# Altium PCB AltiumSTM32_PCB.PcbDoc
Units mm, origin at the board's own origin, x right, y up, seen from the top; angles counter-clockwise.
Board outline 38.18 x 25.84 mm, 4 copper layers (L1 (Signal), l2 (Gnd), L3 (Gnd), L4 (Signal)), stack 1.57 mm thick; 35 components, 27 nets, 164 pads, 37 vias.
Unrouted connection lines stored in the file: 13.
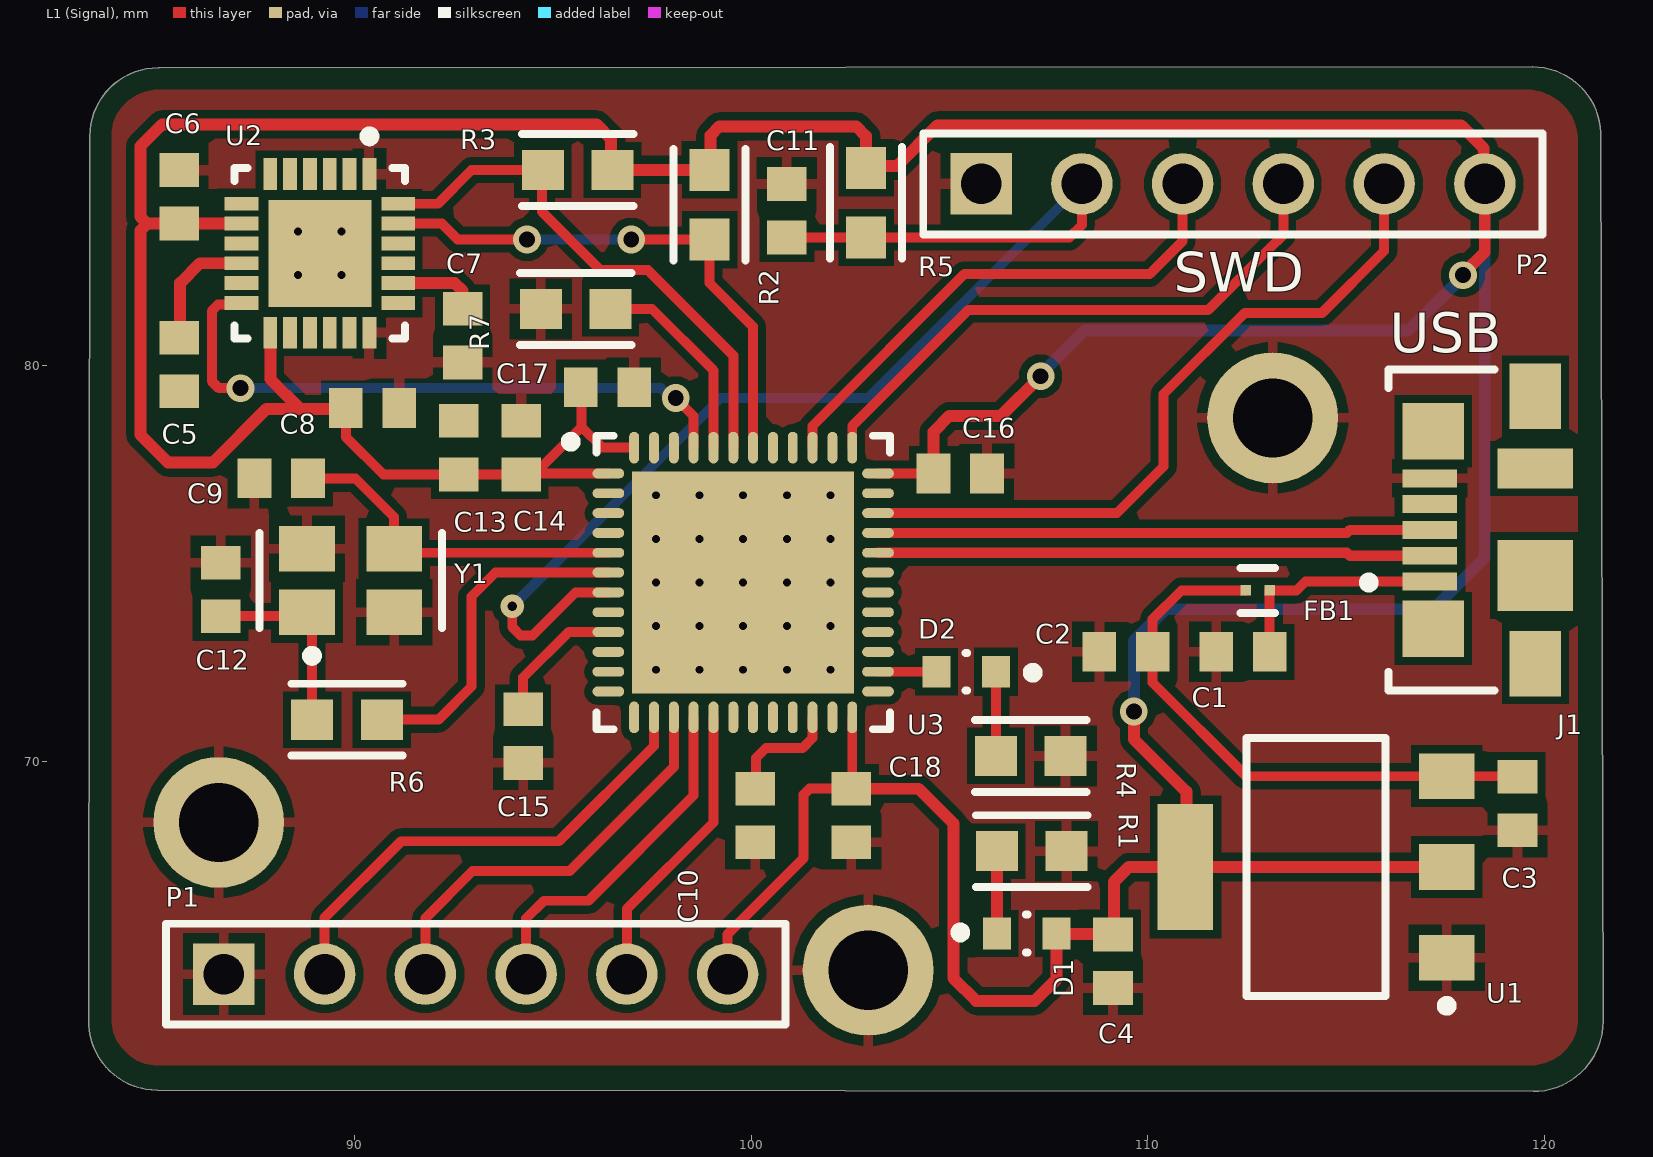
[diagram p0: L1 (Signal) view]
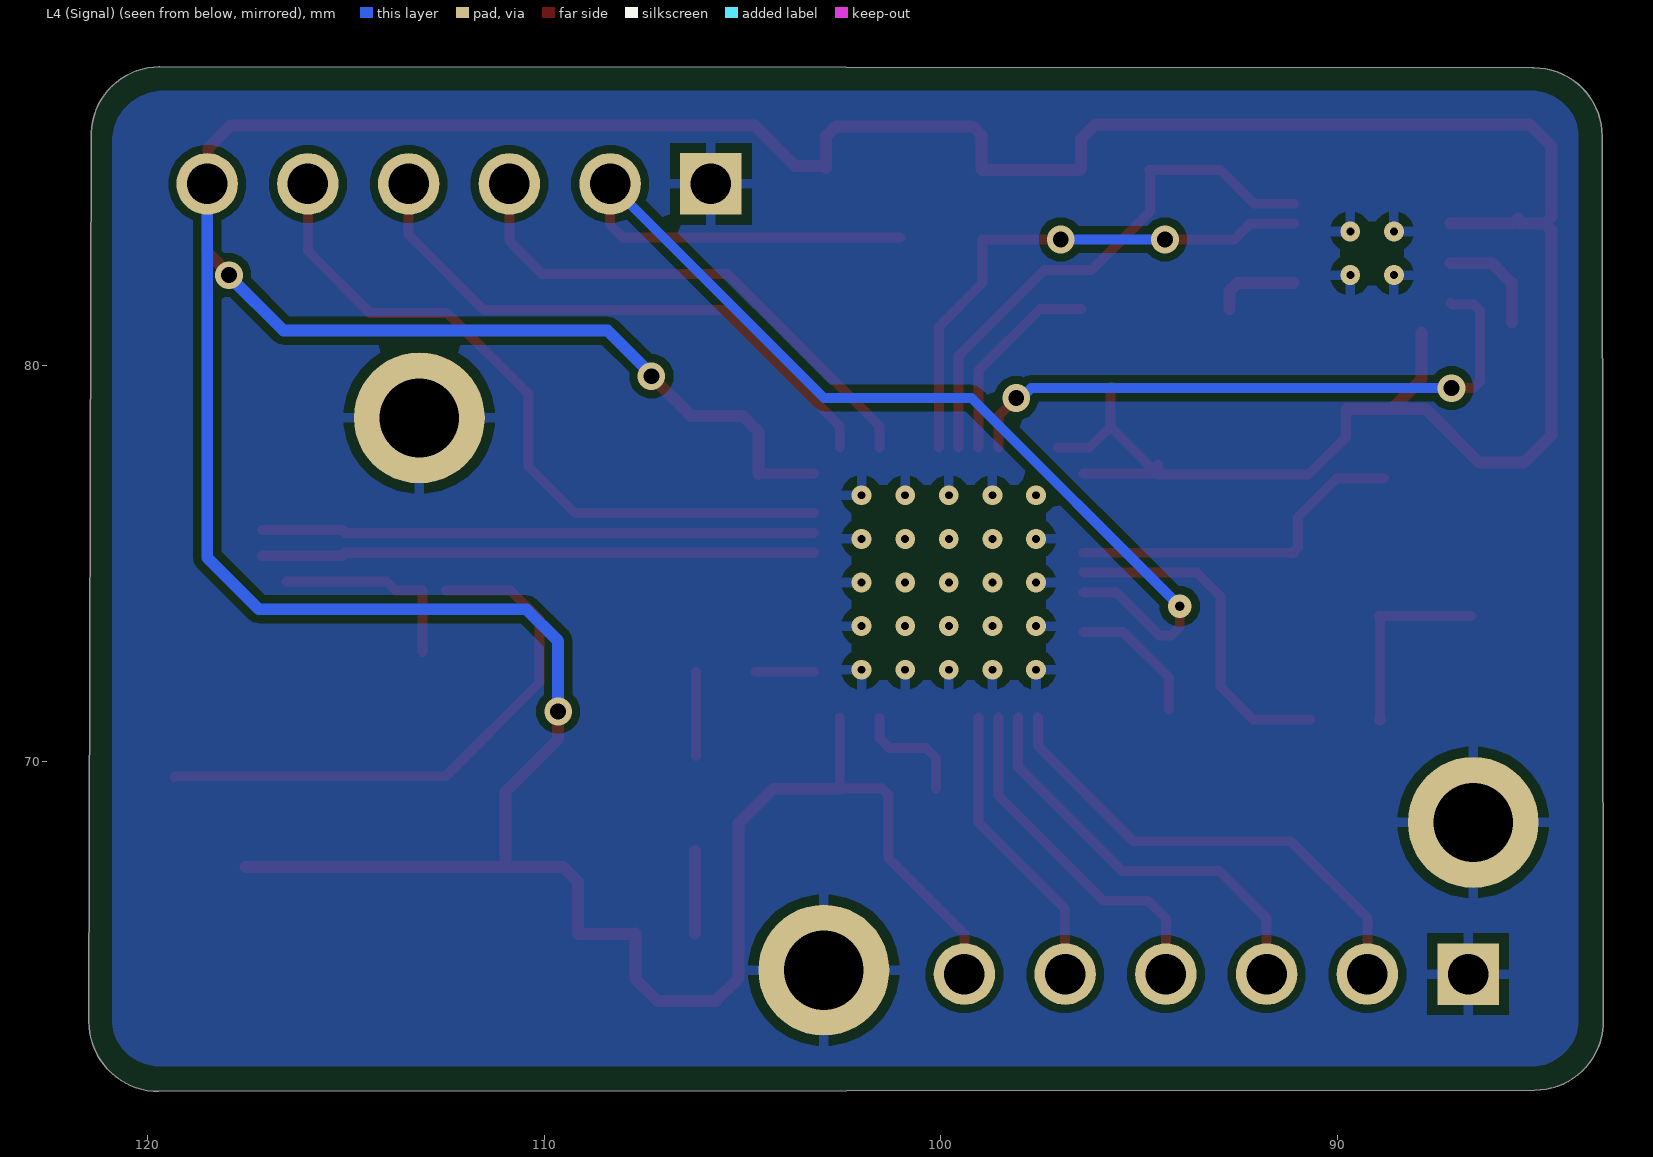
[diagram p1: L4 (Signal) view, seen from below]
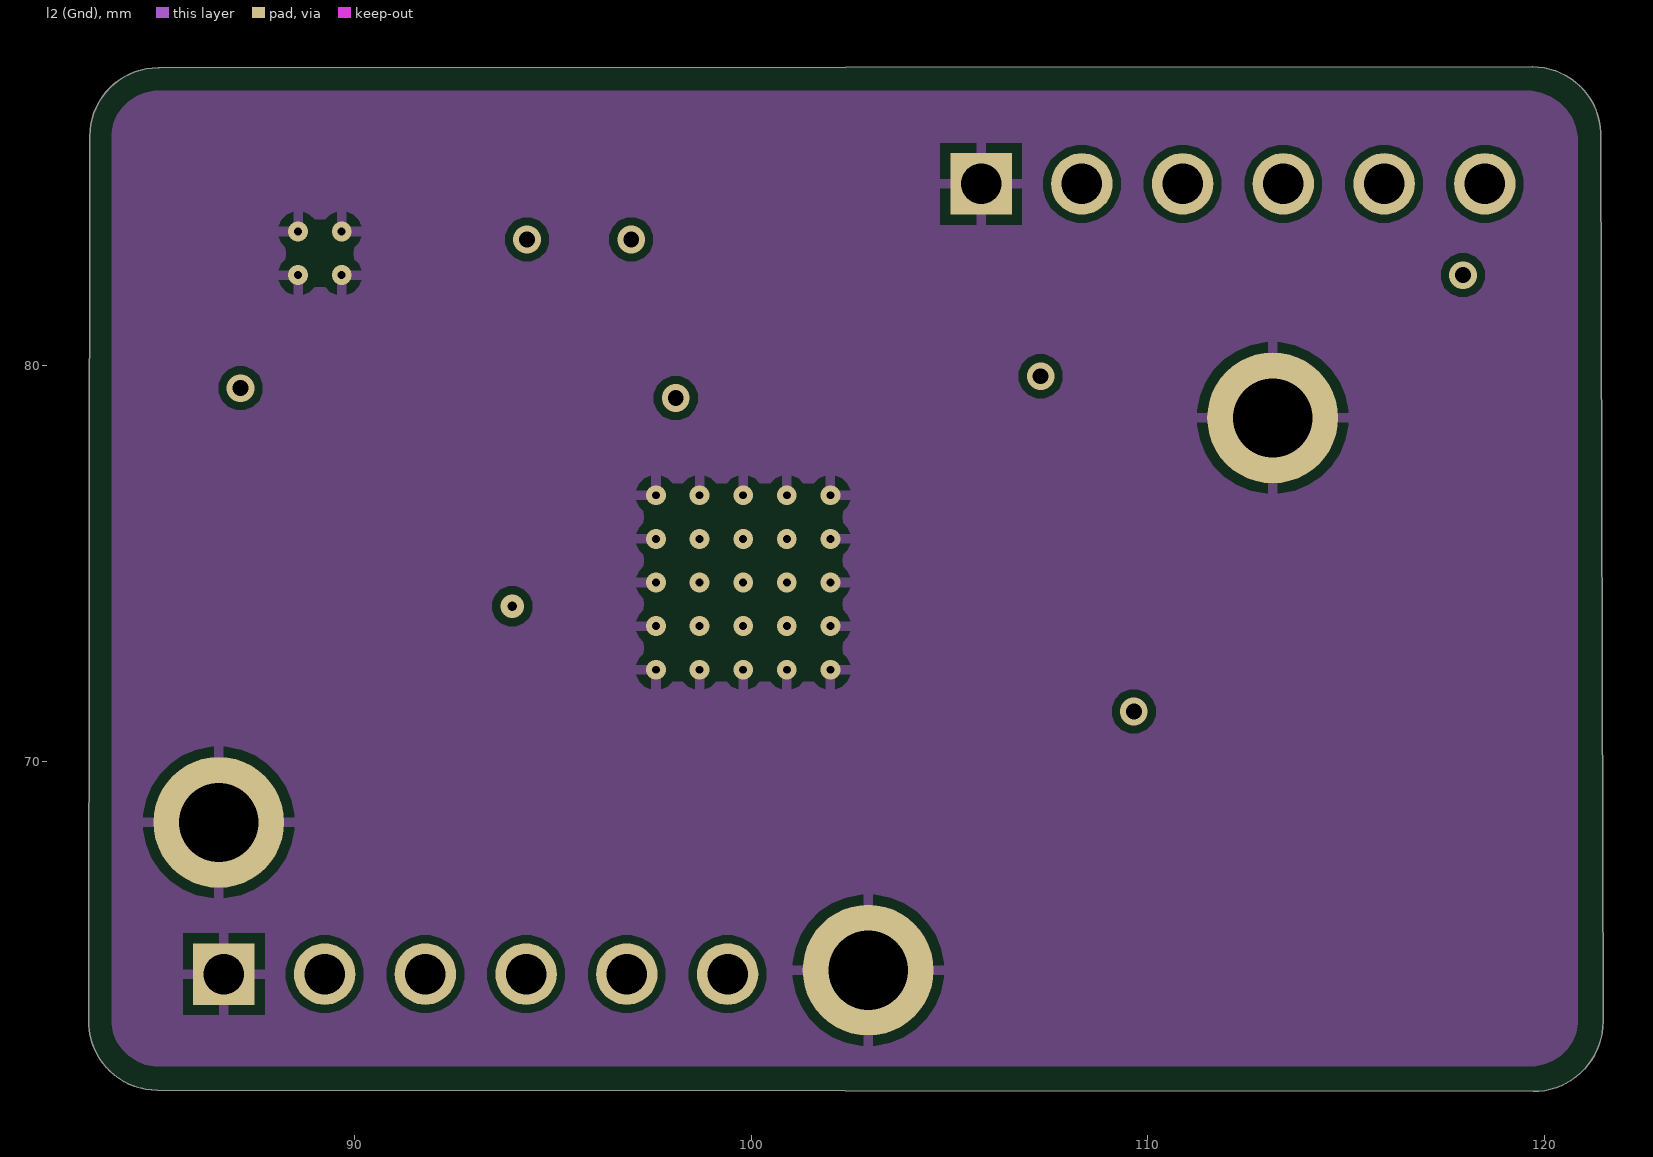
[diagram p2: l2 (Gnd)]
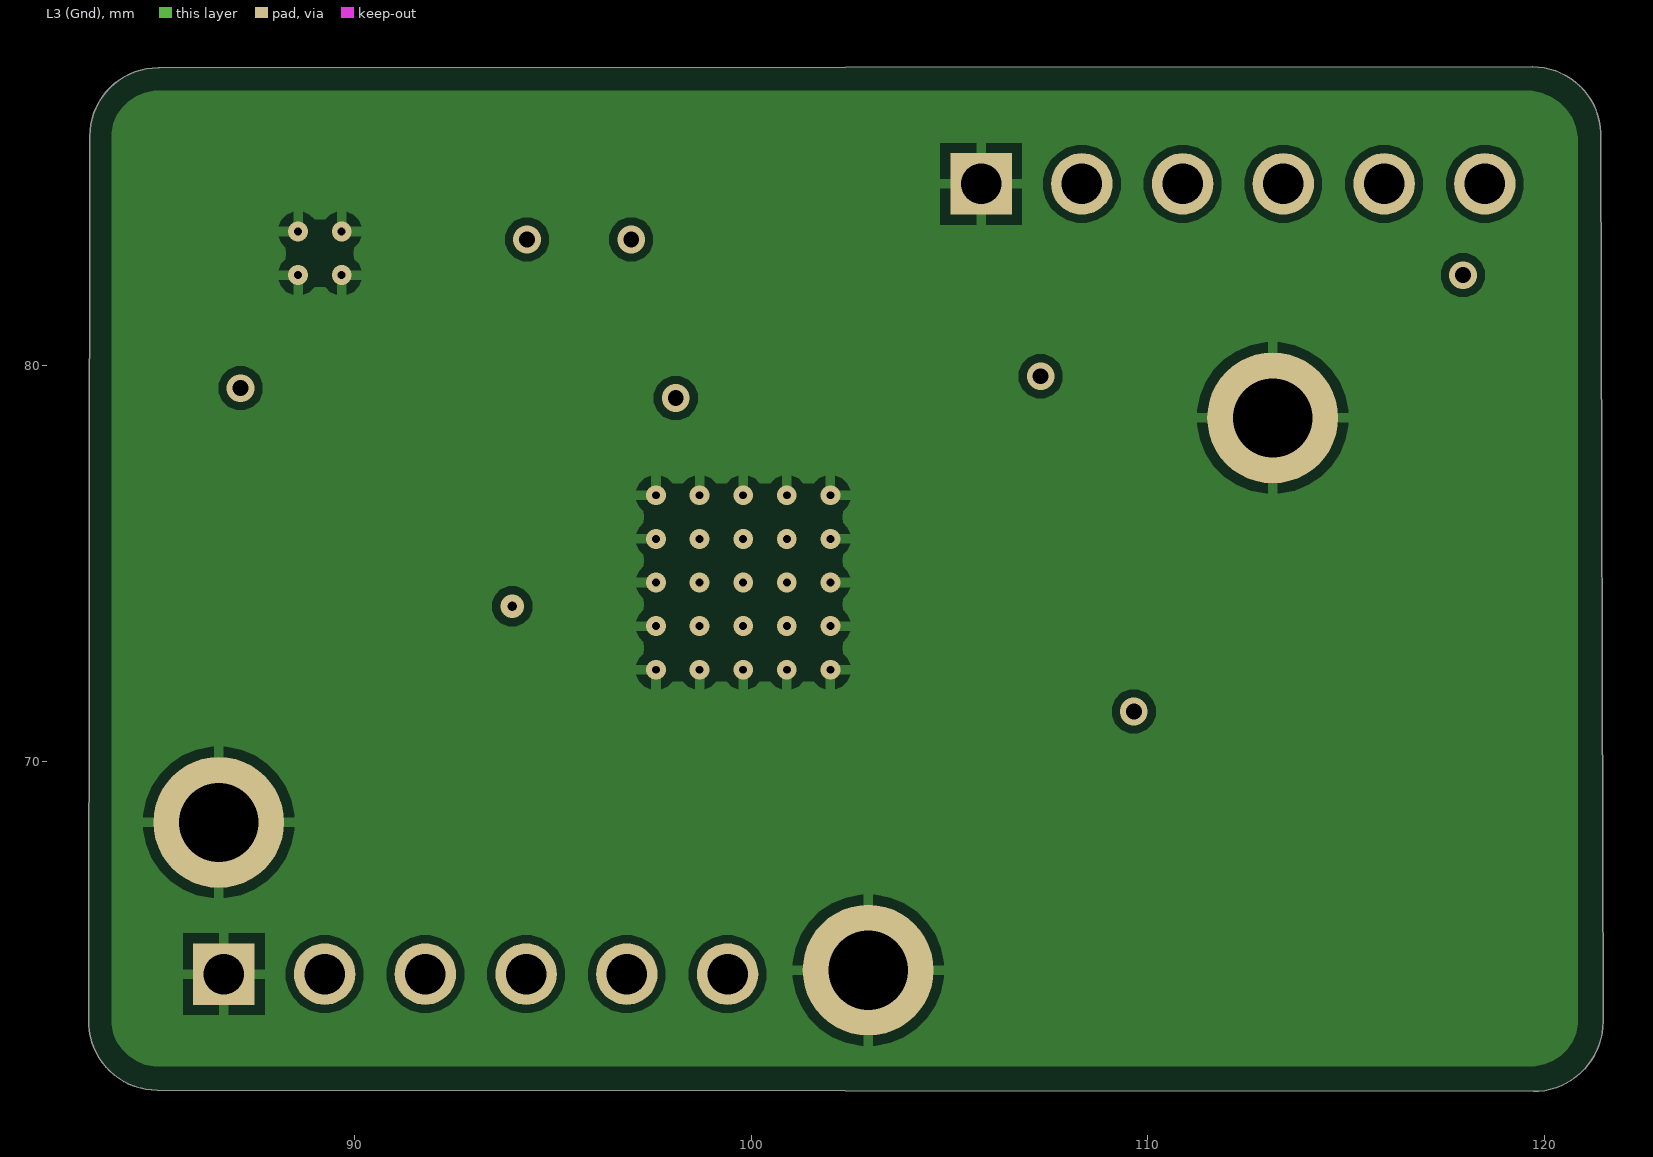
[diagram p3: L3 (Gnd)]

## Layer stack, top to bottom
Top Solder: solder mask 0.0254, SM-001, Dk 4
L1 (Signal): signal copper 0.035
Dielectric 1: prepreg 0.2, PP-017, Dk 4.6
l2 (Gnd): signal copper 0.0175
Dielectric 3: core 1.065, Core-039, Dk 4.8
L3 (Gnd): signal copper 0.0175
Dielectric 5: prepreg 0.2, PP-017, Dk 4.6
L4 (Signal): signal copper 0.035
Bottom Solder: solder mask 0.0254, SM-001, Dk 4

## Board outline
83.299,63.37 ccw(c85.025,63.45) 85.025,61.723 119.719,61.69 ccw(c119.719,63.456) 121.484,63.456 121.427,85.85 121.426,85.869 ccw(c119.7,85.8) 119.704,87.527 119.7,87.527 85.071,87.502 85.05,87.504 ccw(c85.05,85.776) 83.323,85.776 83.323,85.775

## Design rules (kind name [scope] priority, off if disabled: settings)
Clearance [All] p1: gap=0.2 ignorepadtopadclearanceinfootprint=FALSE
DiffPairsRouting [All] p1: maxlimit=0.254 minlimit=0.203 mostfreqgap=0.254 toplayer_maxgap=0.203 toplayer_prefgap=0.203 toplayer_minwidth=0.26 toplayer_maxwidth=0.26 toplayer_prefwidth=0.26 bottomlayer_maxgap=0.203 bottomlayer_prefgap=0.203 bottomlayer_minwidth=0.26 bottomlayer_maxwidth=0.26 bottomlayer_prefwidth=0.26 impedanceprofiledriven=TRUE impedanceprofileid={60D9353D-1B09-4BF2-BB60-DCA3EFFD3613} impedanceprofilevalue=90.000000 maxuncoupledlength=12.7
PolygonConnect [All] p1: connectstyle=Relief reliefconductorwidth=0.254 reliefentries=4 polygonreliefangle="90 Angle" airgapwidth=0.254
RoutingVias [All] p1: holewidth=0.3 width=0.7 viastyle="Through Hole" minholewidth=0.25 minwidth=0.55 maxholewidth=0.4 maxwidth=0.9
SolderMaskExpansion [All] p1: expansion=0 istentingtop=FALSE
SupplyNets "Schematic Supply Nets_3" [InNet('VBUS')] p1: voltage=0.000
SupplyNets "Schematic Supply Nets_2" [InNet('+5v')] p2: voltage=0.000
SupplyNets "Schematic Supply Nets_1" [InNet('+3.3v')] p3: voltage=0.000
SupplyNets "Schematic Supply Nets" [InNet('GND')] p4: voltage=0.000
Width [All] p1: maxlimit=1 minlimit=0.2 preferedwidth=0.3 midlayer1_minwidth=0.254 midlayer1_maxwidth=0.254 midlayer1_prefwidth=0.254 midlayer2_minwidth=0.254 midlayer2_maxwidth=0.254 midlayer2_prefwidth=0.254 minimp=50.000000 maximp=50.000000 favimp=50.000000
29 further rules are at their usual default settings.

## Classes and differential pairs
differential pair USB_D: +USB_D_P -USB_D_N

## Components (designator, comment, footprint, x,y, rotation, side; value= is the part's Value field where it differs from the comment)
C1 "2u2" CAPC1608X92X38NL15T08 112.4,72.775 r0 top
C2 "2u2" CAPC1608X92X38NL15T08 109.45,72.775 r0 top
C3 "22u" CAPC1608X92X38NL15T08 119.325,68.95 r90 top
C4 "22u" CAPC1608X92X38NL15T08 109.125,64.975 r90 top
C5 "100n" CAPC1608X92X38NL15T08 85.575,80.025 r90 top
C6 "10n" CAPC1608X92X38NL15T08 85.575,84.25 r270 top
C7 "2n2" CAPC1608X92X38NL15T08 92.725,80.75 r90 top
C8 "100n" CAPC1608X92X38NL15T08 90.45,78.925 r180 top
C9 "10p" CAPC1608X92X38NL15T08 88.15,77.15 r0 top
C10 "2u2" CAPC1608X92X38NL15T08 100.1,68.65 r90 top
C11 "100n" CAPC1608X92X38NL15T08 100.9,83.9 r270 top
C12 "10p" CAPC1608X92X38NL15T08 86.625,74.35 r270 top
C13 "22u" CAPC1608X92X38NL15T08 92.625,77.925 r270 top
C14 "100n" CAPC1608X92X38NL15T08 94.2,77.925 r270 top
C15 "100n" CAPC1608X92X38NL15T08 94.25,70.65 r90 top
C16 "100n" CAPC1608X92X38NL15T08 105.275,77.275 r180 top
C17 "100n" CAPC1608X92X38NL15T08 96.375,79.45 r180 top
C18 "100n" CAPC1608X92X38NL15T08 102.525,68.65 r90 top
D1 "APHD1608LZGCK" FP-APHD1608LZGCK-MFG 106.95,65.675 r0 top
D2 "APHD1608LZGCK" FP-APHD1608LZGCK-MFG 105.425,72.275 r180 top
FB1 "120R" FP-MMZ0603-IPC_C 112.775,74.325 r180 top (schematic designator FB?)
J1 "473460001" FP-473460001-MFG 119.425,75.85 r90 top
P1 "TSW-106-23-G-S" SMTC-TSW-106-23-X-S 86.705,64.65 r0 top
P2 "TSW-106-23-G-S" SMTC-TSW-106-23-X-S 105.8,84.575 r0 top
R1 "1k" FP-AC0603-IPC_A 107.075,67.75 r180 top
R2 "2K2" FP-AC0603-IPC_A 98.95,84.048 r90 top
R3 "2K2" FP-AC0603-IPC_A 95.625,84.925 r0 top
R4 "1k" FP-AC0603-IPC_A 107.05,70.15 r180 top
R5 "10k" FP-AC0603-IPC_A 102.9,84.1 r90 top
R6 "0R" FP-AC0603-IPC_A 89.809,71.065 r180 top
R7 "10k" FP-AC0603-IPC_A 95.575,81.425 r0 top
U1 "AMS1117-3.3" FP-AMS1117-IPC_C 114.245,67.35 r180 top
U2 "MPU-6050" IS-QFN-24_V 89.125,82.825 r270 top
U3 "STM32F411CEU6" STM-UFQFPN48_L 99.8,74.525 r0 top
Y1 "24MHZ" FP-TSX-3225-MFG 89.9,74.575 r0 top

## Footprints (in the part's own frame and the unit in brackets; to place one, negate y for a bottom-side part, rotate by r counter-clockwise, add the part's x,y. Pads: shape width x height; smd on the part's side, far side on the other; paste and mask are expansions set on the pad)
CAPC1608X92X38NL15T08 [mm] "Chip Capacitor, 2-Leads, Body 1.60x0.80mm, IPC Medium Density"
  rect 0.85x1 smd: 1(-0.675,0) 2(0.675,0)
  body extent -0.87,-0.48 0.87,0.47, height 0.92
FP-473460001-MFG [mm]
  rect 0.45x1.38 smd paste+0 mask+0: 1(-1.3,2.31) 2(-0.65,2.31) 3(0,2.31) 4(0.65,2.31) 5(1.3,2.31)
  rect 1.425x1.55 smd paste+0 mask+0: 6(-2.488,2.225) 7(2.488,2.225)
  rect 1.65x1.3 smd paste+0 mask+0: 8(-3.375,-0.35) 11(3.375,-0.35)
  rect 1.8x1.9 smd paste+0 mask+0: 9(-1.15,-0.35)
  rect 1x1.9 smd paste+0 mask+0: 10(1.55,-0.35)
  silkscreen extent -4.05,0.67 4.05,3.97, body extent -4.3,-2.48 4.3,3.45, height 0.25
FP-AC0603-IPC_A [mm]
  rect 1.059x1.012 smd paste+0 mask+0: 1(-0.877,0) 2(0.877,0)
  silkscreen extent -1.41,-0.91 1.41,0.91, body extent -1.91,-1.01 1.91,1.01, height 0.25
FP-AMS1117-IPC_C [mm]
  rect 1.4x1.15 smd paste+0 mask+0: 1(-3.295,2.29) 2(-3.295,0) 3(-3.295,-2.29)
  rect 1.404x3.182 smd paste+0 mask+0: 4(3.295,0)
  silkscreen extent -3.42,-3.25 1.75,3.62, body extent -3.9,-3.35 3.9,3.35, height 0.25
FP-APHD1608LZGCK-MFG [mm]
  rect 0.7x0.8 smd paste+0 mask+0: 1(-0.75,0) 2(0.75,0)
  silkscreen extent -1.8,-0.48 0.03,0.48, body extent -1.2,-0.58 1.2,0.58, height 0.25
FP-MMZ0603-IPC_C [mm]
  rect 0.263x0.263 smd paste+0 mask+0: 1(-0.3,0) 2(0.3,0)
  silkscreen extent -0.43,-0.57 0.43,0.57, body extent -0.53,-0.27 0.53,0.27, height 0.25
FP-TSX-3225-MFG [mm]
  rect 1.4x1.15 smd paste+0 mask+0: 1(-1.1,-0.8) 2(1.1,-0.8) 3(1.1,0.8) 4(-1.1,0.8)
  silkscreen extent -2.3,-2.02 2.3,1.2, body extent -1.9,-1.48 1.9,1.48, height 0.25
IS-QFN-24_V [mm] "QFN, 24-Leads, Body 4x4mm, Pitch 0.5mm, Thermal Pad 2.7x2.6mm"
  rect 0.8x0.35 smd: 1(-2,1.25) 2(-2,0.75) 3(-2,0.25) 4(-2,-0.25) 5(-2,-0.75) 6(-2,-1.25) 13(2,-1.25) 14(2,-0.75) 15(2,-0.25) 16(2,0.25) 17(2,0.75) 18(2,1.25)
  rect 0.35x0.85 smd mask+0.102: 7(-1.25,-1.975) 8(-0.75,-1.975) 9(-0.25,-1.975) 10(0.25,-1.975) 11(0.75,-1.975) 12(1.25,-1.975) 19(1.25,1.975) 20(0.75,1.975) 21(0.25,1.975) 22(-0.25,1.975) 23(-0.75,1.975) 24(-1.25,1.975)
  rect 2.7x2.6 smd: 25(0,0)
  silkscreen extent -3.07,-2.15 2.15,2.15, body extent -2,-2 2,2, height 0.95
SMTC-TSW-106-23-X-S [mm] ".025 SQ Post Terminal Strip Assembly, 1x6 Pins, Vertical, 2.54mm Pitch, Male"
  rect 1.55x1.55 hole 1.02: 1(0,0)
  round 1.55 hole 1.02: 2(2.54,0) 3(5.08,0) 4(7.62,0) 5(10.16,0) 6(12.7,0)
  silkscreen extent -1.46,-1.27 14.16,1.27, body extent -1.27,-1.27 13.97,1.27, height 8.38
STM-UFQFPN48_L [mm] "QFN, 48-Leads, Body 7.1x7.1mm, Pitch 0.5mm, Thermal Pad 5.6x5.6mm, IPC High Density"
  oval 0.8x0.25 smd: 1(-3.4,2.75) 2(-3.4,2.25) 3(-3.4,1.75) 4(-3.4,1.25) 5(-3.4,0.75) 6(-3.4,0.25) 7(-3.4,-0.25) 8(-3.4,-0.75) 9(-3.4,-1.25) 10(-3.4,-1.75) 11(-3.4,-2.25) 12(-3.4,-2.75) 25(3.4,-2.75) 26(3.4,-2.25) 27(3.4,-1.75) 28(3.4,-1.25) 29(3.4,-0.75) 30(3.4,-0.25) 31(3.4,0.25) 32(3.4,0.75) 33(3.4,1.25) 34(3.4,1.75) 35(3.4,2.25) 36(3.4,2.75)
  oval 0.25x0.8 smd: 13(-2.75,-3.4) 14(-2.25,-3.4) 15(-1.75,-3.4) 16(-1.25,-3.4) 17(-0.75,-3.4) 18(-0.25,-3.4) 19(0.25,-3.4) 20(0.75,-3.4) 21(1.25,-3.4) 22(1.75,-3.4) 23(2.25,-3.4) 24(2.75,-3.4) 37(2.75,3.4) 38(2.25,3.4) 39(1.75,3.4) 40(1.25,3.4) 41(0.75,3.4) 42(0.25,3.4) 43(-0.25,3.4) 44(-0.75,3.4) 45(-1.25,3.4) 46(-1.75,3.4) 47(-2.25,3.4) 48(-2.75,3.4)
  rect 5.6x5.6 smd: 49(0,0)
  silkscreen extent -4.47,-3.7 3.7,3.7, body extent -3.55,-3.55 3.55,3.55, height 0.6

## Part data
C1 C2 C3 C4 C5 C6 C7 C8 C9 C10 C11 C12 C13 C14 C15 C16 C17 C18: library part CMP-2006-01455-1, Manufacturer=Vitramon, Part Number=VJ0603A150JXAAT
D1 D2: library part CMP-44529-000045-1, "LED GREEN CLEAR 1608 SMD", Case Code (Imperial)=0603, Case Code (Metric)=1608, Color=Green, Forward Voltage=2.65V, Lens Color=Colorless, Test Current=2mA, Case/Package=0603, Dominant Wavelength=525nm, Height=0.75mm, Length=1.6mm, Lens Size=0.7mm, Lens Style=Round, Lens Transparency=Clear, Luminous Intensity=180mcd, Mount="Surface Mount", Packaging="Tape and Reel", Viewing Angle=100°, Width=0.8mm
FB1: library part CMP-06046-002357-1, "Chip Ferrite Bead, 1206, 1000Ω @ 100MHz, 0.075Ω, 25%, 2A", Case Code (Imperial)=1206, Case Code (Metric)=3216, DC Resistance (DCR)=75mR, Max Current Rating=2A, Max Operating Temperature=125°C, Min Operating Temperature=-55°C, Case/Package=1206, Mount="Surface Mount", Number of Lines=1, Packaging="Tape and Reel", RoHS Compliant=Yes
J1: library part CMP-2000-05246-2, "CONN RCPT USB2.0 MICRO B SMD R/A", Current Rating=1.8A, Manufacturer=Molex, Package=0, Temperature="-30°C to +85°C", Temperature Range High=+85°C, Temperature Range Low=-30°C, Voltage Rating=30V, Automotive=No, Category=Conn, ComponentLink2Description=Datasheet, ComponentLink2URL=https://www.molex.com/webdocs/datasheets/pdf/en-us/0473460001_IO_CONNECTORS.pdf, Conn Orientation="Right Angle", Contact Material=Gold,Nickel, Device Class L1=Connectors, Device Class L2="USB Connectors", Device Class L3=unset, Digikey Description="CONN RCPT USB2.0 MICRO B SMD R/A", Footprint Url=https://www.molex.com/pdm_docs/sd/473460001_sd.pdf, Height=2.945mm, Is Female=yes, Lead Free=Yes, Manufacturer Part Number=473460001, Number Of Contacts=5, Octopart=https://octopart.com/47346-0001-molex-7164928, Pitch=0.65mm, RoHS=TRUE, Shielding=true, Usb Standard="USB 2.0"
P1 P2: library part CMP-1024-00396-1, "0.025\" SQ Post Header, Through-hole, Vertical, -55 to 125 degC, 2.54 mm Pitch, 6-Pin, Male, RoHS", Manufacturer=Samtec, Temperature Range="-55 to 125 degC", ComponentLink1Description="Manufacturer URL", ComponentLink1URL=http://www.samtec.com, ComponentLink2Description=Datasheet, ComponentLink2URL=http://www.samtec.com/documents/webfiles/pdf/TSW_TH.PDF, ComponentLink3Description="Package Specification", ComponentLink3URL=http://www.samtec.com/documents/webfiles/cpdf/TSW-XXX-XX-XXX-X-XX-XXX-MKT.pdf, DatasheetVersion=F-214, Mounting Technology=Through-hole, Orientation=Vertical, PackageDescription=".025[0.64] SQ. Post Terminal Strip Assembly", PackageReference=TSW-106-23-X-S, PackageVersion="DM, 8/1988", PartNumber=TSW-106-23-G-S, Pitch="2.54 mm", RoHS=True
R1 R2 R3 R4 R5 R6 R7: library part CMP-03412-029901-2, "RES 8.66Ω 1.00% 0.1W 0603", RoHS Compliant=Yes
U1: library part CMP-209535-000001-1, "LDO Voltage Regulators 1A, 3.3V", Dropout Voltage=1.1V, Manufacturer="Advanced Monolithic Systems", Max Junction Temp=+125°C, Max Power Dissipation=1.2W, Max Supply Voltage=15V, Nominal Supply Current=5mA, Output Current=1A, Output Voltage=3.3V, Package=AMS1117, Temperature="-40°C to +125°C", Temperature Range Low=-40°C, Automotive=No, Category=IC, ComponentLink2Description=Datasheet, ComponentLink2URL=http://www.advanced-monolithic.com/pdf/ds1117.pdf, Device Class L1="Integrated Circuits (ICs)", Device Class L2="Power Management ICs", Device Class L3="Voltage Regulators - Linear", Height=1.8mm, Ipc Land Pattern Name=SOT229P700X180-4, Lead Free=Yes, Manufacturer Part Number=AMS1117-3.3, Number Of Outputs=1, Octopart=https://octopart.com/ams1117-3.3-advanced+monolithic+systems-25899300, Output Type=Fixed, RoHS=TRUE, Standoff Height=0.64mm, Temperature Range High=+125°C
U2: library part CMP-1753-00002-2, "3-Axis Gyroscope, Accelerometer and a Digital Motion Processor(TM) (DMP), 2.375 to 3.46 V, -40 to 85 degC, 24-Pin QFN, RoHS, Tape and Reel", Manufacturer=InvenSense, Standard Package=5,000, Category=Sensors,Transducers, Datasheet URL=http://datasheet.octopart.com/MPU-6050-InvenSense-datasheet-14421344.pdf, Datasheet Version="Rev. 3.3, 05/2012", Dynamic Catalog=MPU-6000™Series, Family=Multifunction, Featured Product=MPU-60506-Axis,IntegratedI²CSolution, Manufacturer URL=http://www.invensense.com/, Online Catalog=MPU-6000™Series, Other Names="1428-1007-2 / MPU6050", Output Type=Digital, Sensor Type=MotionTracking, Unit PriceUSD=Digital
U3: library part CMP-0243-00165-1, "ARM Cortex-M4 32-bit MCU+FPU, 512 KB Flash, 128 KB RAM, 36 I/Os, 48-Pin UFQFPN, -40 to 85 degC, Tray", I/Os (High Current)=36, Operating Frequency(F) (Processor speed) (MHz)=100, Package Description=UFQFPN48, Package Reference="48-Pin Ultra Thin Fine Pitch Quad Flat No-Lead, 7 x 7 x 0.6 mm Body, 0.5 mm Pitch, Exposed Pad", Supply Voltage(Vcc) min (V)=1.7, ComponentLink1Description="Manufacturer URL", ComponentLink1URL=http://www.st.com/, ComponentLink2Description=Datasheet, ComponentLink2URL=http://www.st.com/st-web-ui/static/active/en/resource/technical/document/datasheet/DM00115249.pdf, Core="ARM Cortex-M4", DatasheetVersion="Rev. 6", FLASH Size (Prog) (kB)=512, Internal RAM Size (kB)=128, Mounting Technology="Surface Mount", Packing=Tray
Y1: library part CMP-36405-000018-1, "CRYSTAL 24.0000MHZ 9PF SMD", Case/Package=SMD/SMT, ESR (Equivalent Series Resistance)=40R, Frequency=24MHz, Frequency Stability=20ppm, Frequency Tolerance=10ppm, Load Capacitance=9pF, Max Operating Temperature=105°C, Min Operating Temperature=-40°C, Package Quantity=250, Depth=2.5mm, Drive Level=200uW, Height=0.024inch, Lead Free="Lead Free", Length=3.2mm, Mount="Surface Mount", Number of Pins=4, Packaging="Tape and Reel", RoHS Compliant=Yes, Series=TSX-3225, Termination=SMD/SMT, Tolerance=10ppm, Weight=0.000564oz, Width=2.5mm

## Free pads (board coordinates)
  round 3.3 hole 2: 1(86.575,68.475) 7(113.15,78.675) 8(102.95,64.75)

## Via types
v1: diameter 0.5, hole 0.2, L1 (Signal) to L4 (Signal), 29 vias
v2: diameter 0.7, hole 0.4, L1 (Signal) to L4 (Signal), 7 vias
v3: diameter 0.6, hole 0.25, L1 (Signal) to L4 (Signal), 1 vias

## Nets (pads, with @x,y where several pads share a name; then routed paths per layer and width w, separated by ;. In a path a pad name is that pad's centre, name@x,y a point inside that pad or via, vN(x,y) a via of type N, cw(c..) or ccw(c..) an arc to the next point about the centre after c; other vN are vias at no path point)
+3.3v: C4.2 C6.2 C8.2 C13.2 C14.2 C15.2 C16.2 C17.2 C18.2 D1.2 P1.6 P2.6 R2.2 R3.2 R5.2 U1.2 U1.4 U2.8 U2.13 U3.1 U3.9 U3.24 U3.36 U3.48 | length 148.5
  L1 (Signal) w0.25: C8.2@89.775,78.85 89.775,78.9 C8.2 89.779,78.921 89.779,78.196 90.725,77.25 C13.2 ; C13.2@92.725,77.25 C14.2 C14.2@94.525,77.25 ; C15.2 94.25,72.125 95.4,73.275 U3.9 ; C14.2@94.375,77.275 C14.2@94.525,77.275 ; C14.2@94.525,77.5 C14.2@94.525,77.275 ; C17.2 95.725,79.425 95.725,78.45 ; U3.1 C14.2@94.55,77.275 ; U3.48 96.25,77.925 95.725,78.45 ; P1.6 99.405,65.655 101.325,67.575 101.325,69.179 101.471,69.325 C18.2 102.55,69.35 U3.24 ; U3.36 C16.2 ; C14.2@94.525,77.25 C14.2@94.525,77.275 ; C14.2@94.525,77.25 C14.2@94.55,77.275 ; C14.2@94.525,77.275 C14.2@94.55,77.275 ; C14.2@94.55,77.275 95.725,78.45
  L1 (Signal) w0.3: C6.2@85.45,83.575 84.776,83.575 ; C6.2@85.45,83.7 C6.2 ; C6.2@85.6,83.575 U2.8 ; U2.13 87.875,79.65 88.625,78.9 ; C8.2@89.775,78.9 88.625,78.9 ; C18.2 104.225,69.325 105.1,68.45 105.1,64.55 105.675,63.975 107.15,63.975 107.7,64.525 D1.2 107.712,65.663 109.112,65.663 C4.2 109.15,65.675 109.15,66.975 109.525,67.35 U1.4 ; C16.2 104.6,78.325 105,78.725 106.3,78.725 v2(107.3,79.725) ; v2(109.65,71.275) 109.65,70.575 110.975,69.25 110.975,67.375 U1.4 ; U1.2 U1.4 ; v2(117.95,82.275) 117.95,82.306 118.5,82.856 P2.6 118.475,84.6 118.475,85.475 117.9,86.05 104.7,86.05 103.675,85.025 102.948,85.025 R5.2 102.895,84.982 102.895,85.78 102.65,86.025 99.2,86.025 98.979,85.804 98.979,84.954 R2.2 R3.2 96.47,84.957 96.47,85.705 96.1,86.075 85.15,86.075 84.6,85.525 84.6,83.751 84.776,83.575 ; 84.776,83.575 84.6,83.399 84.6,78.25 85.3,77.55 86.425,77.55 87.775,78.9 88.625,78.9
  L4 (Signal) w0.3: v2(107.3,79.725) 107.3,79.775 108.4,80.875 116.574,80.875 117.95,82.251 v2(117.95,82.275) ; v2(109.65,71.275) 109.65,73.05 110.45,73.85 117.2,73.85 118.5,75.15 P2.6
+5v: C2.2 C3.2 FB1.2 U1.3 | length 14.4
  L1 (Signal) w0.25: FB1.2 110.85,74.325 110.125,73.6 110.125,72 112.485,69.64 U1.3 119.31,69.64 C3.2
GND: C1.1 C2.1 C3.1 C4.1 C5.1 C6.1 C7.1 C8.1 C9.1 C10.1 C11.1 C12.1 C13.1 C14.1 C15.1 C16.1 C17.1 C18.1 J1.5 P1.1 P2.1 pad.1 pad.7 pad.8 R1.1 R4.1 R7.1 U1.1 U2.1 U2.9 U2.11 U2.18 U2.25 U3.8 U3.23 U3.35 U3.47 U3.49 Y1.2 Y1.4
  other v1: 97.6,72.325 98.7,72.325 99.8,72.325 100.9,72.325 102,72.325 97.6,73.425 98.7,73.425 99.8,73.425 100.9,73.425 102,73.425 97.6,74.525 98.7,74.525 99.8,74.525 100.9,74.525 102,74.525 97.6,75.625 98.7,75.625 99.8,75.625 100.9,75.625 102,75.625 97.6,76.725 98.7,76.725 99.8,76.725 100.9,76.725 102,76.725 88.575,82.275 89.675,82.275 88.575,83.375 89.675,83.375
IMU_CPOUT: C7.2 U2.20 | length 2.2
  L1 (Signal) w0.3: U2.20 92.525,82.075 92.725,81.875 C7.2
IMU_INT: U2.12 U3.45 | length 15.9
  L1 (Signal) w0.25: v2(87.125,79.425) 86.575,79.425 86.4,79.6 86.4,81.375 86.56,81.535 87.11,81.535 U2.12 ; v2(98.1,79.175) 98.55,78.725 U3.45
  L4 (Signal) w0.25: v2(87.125,79.425) 97.728,79.425 97.978,79.175 v2(98.1,79.175)
IMU_REGOUT: C5.2 U2.10 | length 2.8
  L1 (Signal) w0.3: C5.2@85.6,81.075 85.6,82.075 86.1,82.575 U2.10
IMU_SCL: R2.1 U2.23 U3.42 | length 13.7
  L1 (Signal) w0.25: U2.23 92.2,83.575 92.6,83.175 v2(94.35,83.175) ; v2(96.975,83.175) 96.978,83.172 R2.1 98.95,82.075 100.05,80.975 U3.42
  L4 (Signal) w0.25: v2(94.35,83.175) v2(96.975,83.175)
IMU_SDA: R3.1 U2.24 U3.43 | length 13.7
  L1 (Signal) w0.25: U2.24 92.1,84.075 92.95,84.925 R3.1 94.725,84.902 94.725,83.875 96.2,82.4 97.4,82.4 99.55,80.25 U3.43
LED_PWR_K: D1.1 R1.2 | length 2.1
  L1 (Signal) w0.3: R1.2 106.2,67.748 D1.1
MCU_BOOT0: R7.2 U3.44 | length 5.2
  L1 (Signal) w0.25: R7.2 97.5,81.425 99.05,79.875 U3.44
MCU_LED_A: D2.2 U3.26 | length 1.5
  L1 (Signal) w0.25: U3.26 D2.2
MCU_LED_K: D2.1 R4.2 | length 2.1
  L1 (Signal) w0.25: R4.2 106.175,70.152 D2.1
MCU_NRST: C11.2 P2.2 R5.1 U3.7 | length 30.7
  L1 (Signal) w0.25: v3(93.975,73.925) 93.975,73.4 94.188,73.187 94.487,73.187 95.575,74.275 U3.7 ; C11.2@101.025,83.225 102.898,83.225 R5.1 108.023,83.223 108.34,83.54 P2.2
  L4 (Signal) w0.25: v3(93.975,73.925) 99.23,79.18 102.945,79.18 P2.2
MCU_OSC_IN: C9.2 U3.5 Y1.3 | length 8.8
  L1 (Signal) w0.25: C9.2 90.025,77.15 90.996,76.179 90.996,75.404 91.125,75.275 U3.5
MCU_OSC_OUT: R6.1 U3.6 | length 8.6
  L1 (Signal) w0.25: R6.1 92.115,71.065 92.95,71.9 92.95,74.175 93.55,74.775 U3.6
MCU_PA4: P1.2 U3.14 | length 12.2
  L1 (Signal) w0.25: P1.2 89.245,66.07 91.175,68 95.15,68 97.55,70.4 U3.14
MCU_PA5: P1.3 U3.15 | length 10.5
  L1 (Signal) w0.25: P1.3 91.785,66.06 92.975,67.25 95.425,67.25 98.05,69.875 U3.15
MCU_PA6: P1.4 U3.16 | length 8.9
  L1 (Signal) w0.25: P1.4 94.325,66.05 94.775,66.5 95.9,66.5 98.55,69.15 U3.16
MCU_PA7: P1.5 U3.17 | length 7.4
  L1 (Signal) w0.25: P1.5 96.865,66.29 99.05,68.475 U3.17
MCU_SWCLK: P2.4 U3.37 | length 14.7
  L1 (Signal) w0.25: U3.37 102.55,78.475 105.475,81.4 111.525,81.4 113.075,82.95 113.42,83.295 P2.4
MCU_SWDIO: P2.5 U3.34 | length 18.3
  L1 (Signal) w0.25: U3.34 109.225,76.275 110.4,77.45 110.4,79.275 112.45,81.325 114.4,81.325 115.96,82.885 P2.5
MCU_SWO: P2.3 U3.39 | length 13.3
  L1 (Signal) w0.25: U3.39 101.55,78.475 105.375,82.3 110.05,82.3 110.88,83.13 P2.3
MCU_VCAP1: C10.2 U3.22 | length 2.9
  L1 (Signal) w0.25: C10.2@100.125,69.325 100.125,70.1 100.375,70.35 101.3,70.35 101.55,70.6 U3.22@101.55,71.115
USB_D_N: J1.2 U3.32 | length 13.9
  L1 (Signal) w0.26: U3.32 115.025,75.275 115.1,75.2 J1.2
USB_D_P: J1.3 U3.33 | length 13.9
  L1 (Signal) w0.26: U3.33 115.025,75.775 115.1,75.85 J1.3
VBUS: C1.2 FB1.1 J1.1 | length 5.1
  L1 (Signal) w0.25: C1.2 FB1.1 113.75,74.325 113.975,74.55 J1.1@116.5,74.55
XTAL_IN: C12.2 R6.2 Y1.1 | length 4.9
  L1 (Signal) w0.25: C12.2 88.925,73.675 R6.2@88.925,71.072
  L1 (Signal) w0.3: R6.2@88.925,71.072 R6.2
pads on no net: J1.4 J1.6 J1.7 J1.8 J1.9 J1.10 J1.11 U2.2 U2.3 U2.4 U2.5 U2.6 U2.7 U2.14 U2.15 U2.16 U2.17 U2.19 U2.21 U2.22 U3.2 U3.3 U3.4 U3.10 U3.11 U3.12 U3.13 U3.18 U3.19 U3.20 U3.21 U3.25 U3.27 U3.28 U3.29 U3.30 U3.31 U3.38 U3.40 U3.41 U3.46

## Polygon pours and split planes (outlines as drawn)
GND on l2 (Gnd) "GND_L02_P000" (solid, pour order 0): 83.875,85.75 83.875,63.5 ccw(c85.05,63.5) 85.05,62.325 119.65,62.325 ccw(c119.65,63.525) 120.85,63.525 120.85,85.625 ccw(c119.55,85.625) 119.55,86.925 85.05,86.925 ccw(c85.05,85.75)
GND on L3 (Gnd) "GND_L03_P001" (solid, pour order 1): 83.875,85.75 83.875,63.5 ccw(c85.05,63.5) 85.05,62.325 119.65,62.325 ccw(c119.65,63.525) 120.85,63.525 120.85,85.625 ccw(c119.55,85.625) 119.55,86.925 85.05,86.925 ccw(c85.05,85.75)
GND on L1 (Signal) "GND_L01_P002" (solid, pour order 2): 83.875,85.775 83.875,63.525 ccw(c85.05,63.525) 85.05,62.35 119.65,62.35 ccw(c119.65,63.55) 120.85,63.55 120.85,85.65 ccw(c119.55,85.65) 119.55,86.95 85.05,86.95 ccw(c85.05,85.775)
GND on L4 (Signal) "GND_L04_P003" (solid, pour order 3): 83.925,85.75 83.925,63.5 ccw(c85.1,63.5) 85.1,62.325 119.7,62.325 ccw(c119.7,63.525) 120.9,63.525 120.9,85.625 ccw(c119.6,85.625) 119.6,86.925 85.1,86.925 ccw(c85.1,85.75)

## Silkscreen, mask and mechanical layers (free items; w line width, h text height)
Top Overlay:
  text "SWD" at 110.654,81.854 h1
  text "USB" at 116.104,80.329 h1
Mechanical 1:
  lines w0.254: 83.423,63.4 83.45,85.775 ; 83.425,63.45 ccw(c85.025,63.45) 85.025,61.85 119.719,61.818 ccw(c119.719,63.456) 121.357,63.456 121.3,85.85 ; 83.45,85.776 cw(c85.05,85.776) 85.05,87.376 ; 85.075,87.375 119.725,87.4 ; 119.7,87.4 cw(c119.7,85.8) 121.3,85.8